# Altium PCB GripperBottomBoard.PcbDoc (part 2 of 4)
Units mm, origin at the board's own origin, x right, y up, seen from the top; angles counter-clockwise.
Board outline 79.5 x 85 mm, 6 copper layers (Top Layer, GND 01, SIG 01, PWR, GND 02, Bottom Layer), stack 1.705 mm thick; 155 components, 93 nets, 613 pads, 240 vias.
Unrouted connection lines stored in the file: 155.
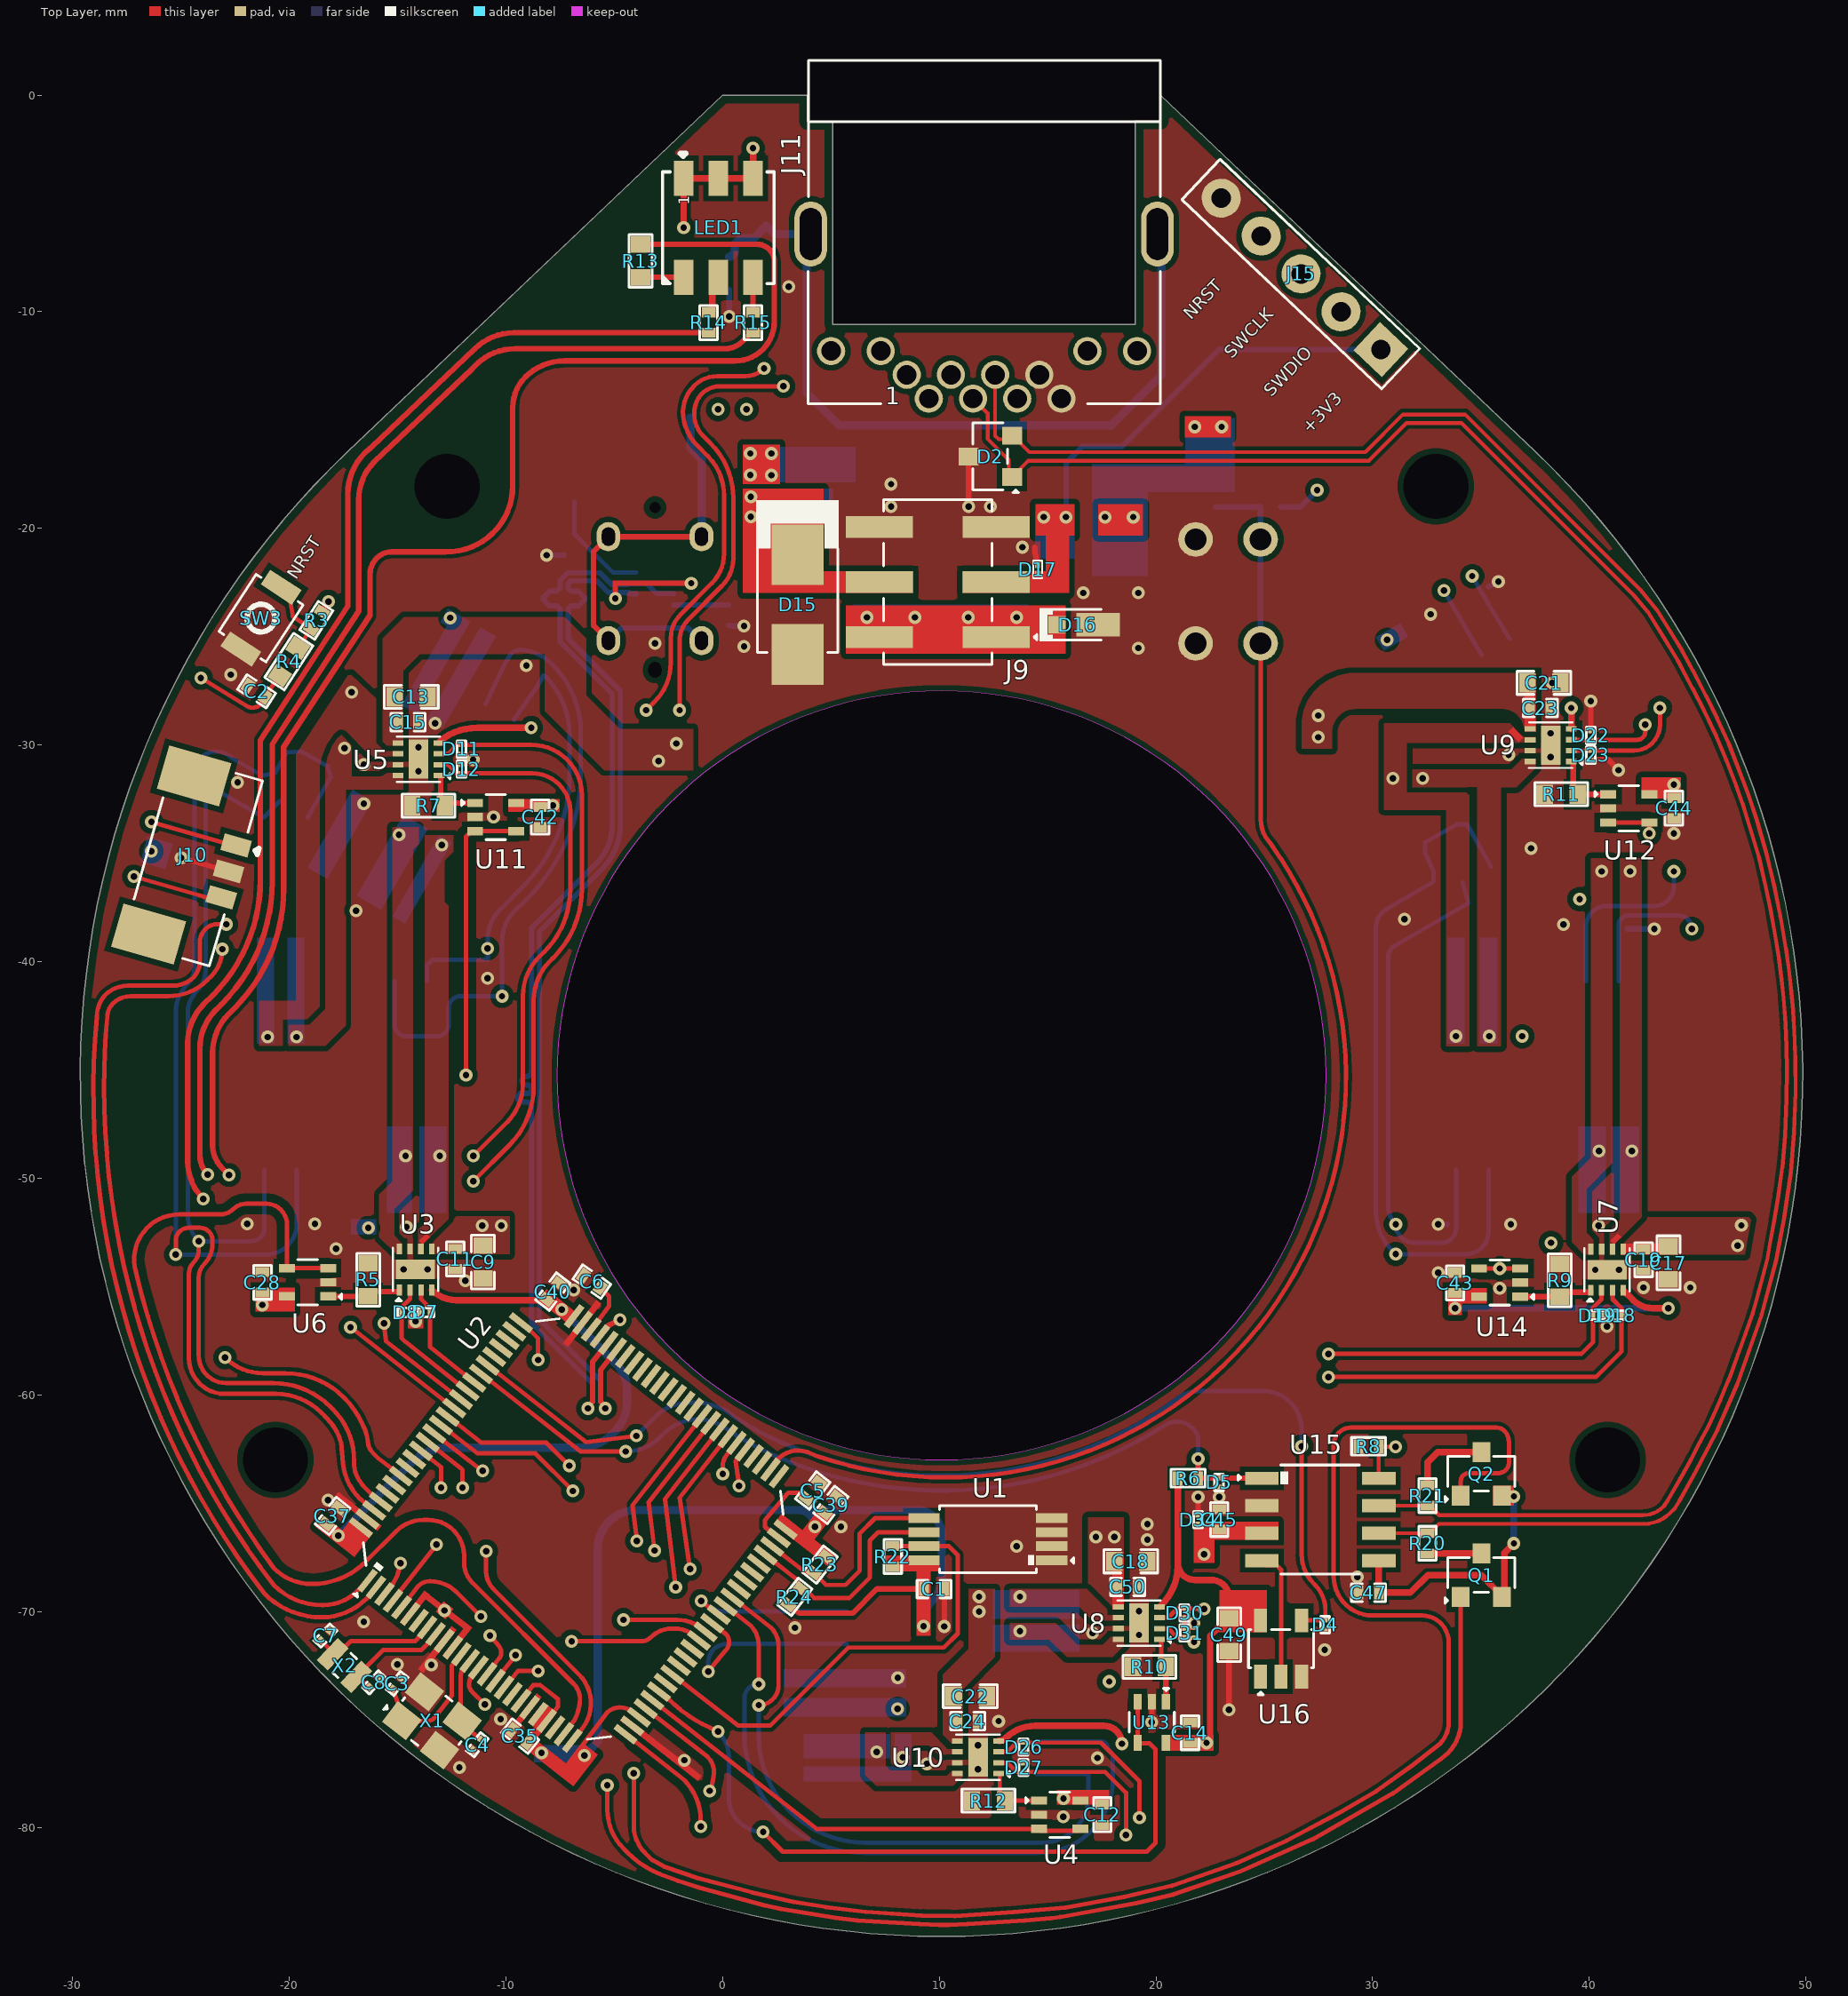
[diagram p0: Top Layer view]

## Part data (continued)
R6: library part RC0402FR-071KL, "RES 1K OHM 1% 1/16W 0402", Case Code (Imperial)=0402, Case Code (Metric)=1005, LCSC Part Number=C106235, Manufacturer=Yageo, Max Operating Temperature=155°C, Max Power Dissipation=63mW, Min Operating Temperature=-55°C, Power Rating=62.5mW, Resistance=1kR, Resistance Tolerance=1%, Resistor Type="Thick Film", Temperature Coefficient=100ppm/°C, Voltage Rating=50V, Case/Package=0402, Category="Chip SMD Resistors", ComponentLink1Description=https://datasheet.ciiva.com/11819/0900766b80c66297-11819477.pdf?src-supplier=RSComponents, ComponentLink1URL=https://datasheet.ciiva.com/11819/0900766b80c66297-11819477.pdf?src-supplier=RSComponents, ComponentLink2Description=https://datasheet.ciiva.com/7983/1018594-7983502.pdf?src-supplier=Element14, ComponentLink2URL=https://datasheet.ciiva.com/7983/1018594-7983502.pdf?src-supplier=Element14, ComponentLink3Description=https://datasheet.ciiva.com/22747/1018594-22747513.pdf?src-supplier=Element14, ComponentLink3URL=https://datasheet.ciiva.com/22747/1018594-22747513.pdf?src-supplier=Element14, ComponentLink4Description=https://datasheet.ciiva.com/12666/pyu-rc0402-51-rohs-l-6-r-12666741.pdf?src-supplier=Mouser, ComponentLink4URL=https://datasheet.ciiva.com/12666/pyu-rc0402-51-rohs-l-6-r-12666741.pdf?src-supplier=Mouser, ComponentLink5Description=https://datasheet.ciiva.com/7849/1018594-7849869.pdf?src-supplier=Element14, ComponentLink5URL=https://datasheet.ciiva.com/7849/1018594-7849869.pdf?src-supplier=Element14, ComponentLink6Description=https://datasheet.ciiva.com/7849/1018594-7849871.pdf?src-supplier=Element14, ComponentLink6URL=https://datasheet.ciiva.com/7849/1018594-7849871.pdf?src-supplier=Element14, ComponentLink7Description=https://datasheet.ciiva.com/17063/pyu-rc0402-51-rohs-l-6-r-17063193.pdf?src-supplier=Future+Electronics, ComponentLink7URL=https://datasheet.ciiva.com/17063/pyu-rc0402-51-rohs-l-6-r-17063193.pdf?src-supplier=Future+Electronics, Construction=Rectangular, Depth=0.5mm, Features="Moisture Resistant", Height=0.32mm, Item Type=Resistor, Lead Free="Lead Free", Length=1mm, Manufacturer Part Number=RC0402FR-071KL, Military Standard=Not, Number of Pins=2, Number of Terminations=2, Packaging="Tape and Reel", Pricing 1="10000=0.00085, 20000=0.00087, 40000=0.00084, 60000=0.00083, 80000=0.00079, 100000=0.00078, 1000000=0.00076 (USD)", Reach SVHC Compliant=Yes, RoHS=Yes, RoHS Compliant=Yes, Series=RC, Size Code=0402, Stock 1=13030000, Supplier 1=Avnet, Supplier Part Number 1=RC0402FR-071KL, Technology="THICK FILM", Termination=SMD/SMT, Tolerance=1%, Voltage Rating (DC)=50V, Width=0.5mm
R8: library part CRCW04021K00FKEDHP, "RES SMD 1K OHM 1% 1/5W 0402", Case Code (Imperial)=0402, Case Code (Metric)=1005, LCSC Part Number=C313354, Manufacturer="Vishay Dale", Max Operating Temperature=155°C, Max Power Dissipation=125mW, Min Operating Temperature=-55°C, Package Quantity=10, Resistance=1kR, Resistance Tolerance=1%, Resistor Type="Thick Film", Supplier Part Number 1=541-1.00KYCT-ND, Temperature Coefficient=100ppm/°C, Voltage Rating=50V, Case/Package=0402, ComponentLink1Description=http://www.farnell.com/datasheets/2339608.pdf?src-supplier=Element14, ComponentLink1URL=http://www.farnell.com/datasheets/2339608.pdf?src-supplier=Element14, ComponentLink2Description=http://www.vishay.com/docs/20043/crcwhpe3.pdf?src-supplier=Digi-Key, ComponentLink2URL=http://www.vishay.com/docs/20043/crcwhpe3.pdf?src-supplier=Digi-Key, ComponentLink3Description=http://www.mouser.com/ds/2/427/crcwhpe3-46056.pdf?src-supplier=Mouser, ComponentLink3URL=http://www.mouser.com/ds/2/427/crcwhpe3-46056.pdf?src-supplier=Mouser, ComponentLink4Description=http://www.vishay.com/docs/20043/crcwhpe3.pdf?src-supplier=Avnet, ComponentLink4URL=http://www.vishay.com/docs/20043/crcwhpe3.pdf?src-supplier=Avnet, ComponentLink5Description=http://www.vishay.com/docs/20043/crcwhpe3.pdf?src-supplier=Future+Electronics, ComponentLink5URL=http://www.vishay.com/docs/20043/crcwhpe3.pdf?src-supplier=Future+Electronics, Construction=Rectangular, Contact Plating=Tin, Depth=0.5mm, Features="Automotive AEC-Q200", Height=0.3mm, Lead Free="Lead Free", Length=1mm, Manufacturer Part Number=CRCW04021K00FKEDHP, Military Standard=Not, Mount="Surface Mount", Number of Pins=2, Number of Terminations=2, Packaging="Tape and Reel", Power Rating=125mW, Pricing 1="1=0.15, 10=0.132, 100=0.0506, 1000=0.02226, 2500=0.01923, 5000=0.0172 (USD)", Radiation Hardening=No, REACH SVHC=Unknown, RoHS Compliant=Yes, Series=CRCW-HP, Size Code=0402, Stock 1=315989, Supplier 1=Digi-Key, Technology="THICK FILM", Termination=SMD/SMT, Tolerance=1%, Voltage Rating (DC)=50V, Weight=2.3E-05oz, Width=0.5mm
R13: library part RC0603FR-07150RL, "RES SMD 150OHM 1/10W 0603", Case Code (Imperial)=0603, Case Code (Metric)=1608, LCSC Part Number=C114608, Manufacturer=Yageo, Max Operating Temperature=155°C, Max Power Dissipation=100mW, Min Operating Temperature=-55°C, Package Quantity=5000, Resistance Tolerance=1%, Resistor Type="Thick Film", Supplier Part Number 1=311-150HRCT-ND, Temperature Coefficient=100ppm/°C, Voltage Rating=50V, Case/Package=0603, Category="Chip SMD Resistors", ComponentLink1Description=https://datasheet.ciiva.com/46412/443971-46412844.pdf?src-supplier=Element14, ComponentLink1URL=https://datasheet.ciiva.com/46412/443971-46412844.pdf?src-supplier=Element14, ComponentLink2Description=https://datasheet.ciiva.com/46440/1868787-46440893.pdf?src-supplier=Element14, ComponentLink2URL=https://datasheet.ciiva.com/46440/1868787-46440893.pdf?src-supplier=Element14, ComponentLink3Description=https://datasheet.ciiva.com/12555/rc0603-272842-12555301.pdf?src-supplier=Mouser, ComponentLink3URL=https://datasheet.ciiva.com/12555/rc0603-272842-12555301.pdf?src-supplier=Mouser, Construction=Rectangular, Depth=0.8mm, Features="Moisture Resistant", Height=0.45mm, Lead Free="Lead Free", Length=1.6mm, Manufacturer Part Number=RC0603FR-07150RL, Military Standard=Not, Number of Pins=2, Number of Terminations=2, Packaging="Tape and Reel", Power Rating=100mW, Pricing 1="1=0.10000, 10=0.02400, 100=0.00970, 1000=0.00436, 2500=0.00378 (USD)", REACH SVHC="No SVHC", Resistance=150R, RoHS=Yes, RoHS Compliant=Yes, Series=RC, Size Code=0603, Stock 1=263721, Supplier 1=Digi-Key, Termination=SMD/SMT, Tolerance=1%, Voltage Rating (DC)=50V, Width=0.8mm
R14 R15: library part RC0402FR-0747RL, "RES 47 OHM 1% 1/16W 0402", Case Code (Imperial)=0402, Case Code (Metric)=1005, LCSC Part Number=C137973, Manufacturer=Yageo, Max Operating Temperature=155°C, Max Power Dissipation=63mW, Min Operating Temperature=-55°C, Package Quantity=1, Resistance Tolerance=1%, Resistor Type="Thick Film", Temperature Coefficient=100ppm/°C, Voltage Rating=50V, Case/Package=0402, Category="Chip SMD Resistors", ComponentLink1Description=LCSC, ComponentLink1URL=https://www.lcsc.com/product-detail/Chip-span-style-background-color-ff0-Resistor-span-Surface-Mount_YAGEO-RC0402FR-0747RL_C137973.html, Construction=Rectangular, Depth=0.5mm, Features="Moisture Resistant", Height=0.016inch, Item Type=Resistor, Lead Free="Lead Free", Length=1mm, Manufacturer Part Number=RC0402FR-0747RL, Military Standard=Not, Number of Terminations=2, Packaging="Tape and Reel", Power Rating=63mW, Pricing 1="10000=0.00085 (USD)", Resistance=47R, RoHS=Yes, RoHS Compliant=Yes, Series=RC, Size Code=0402, Stock 1=390000, Supplier 1=Avnet, Supplier Part Number 1=RC0402FR-0747RL, Technology="THICK FILM", Termination=SMD/SMT, Tolerance=1%, Weight=2.3E-05oz, Width=0.02inch
R17 R18: library part RC0402FR-075K1L, "RES 5.1K OHM 1% 1/16W 0402", Case Code (Imperial)=0402, Case Code (Metric)=1005, LCSC Part Number=C105872, Manufacturer=Yageo, Max Operating Temperature=155°C, Max Power Dissipation=63mW, Min Operating Temperature=-55°C, Package Quantity=1, Resistance=5.1kR, Resistance Tolerance=1%, Resistor Type="Thick Film", Temperature Coefficient=100ppm/°C, Voltage Rating=50V, Case/Package=0402, Category="Chip SMD Resistors", ComponentLink1Description=https://datasheet.ciiva.com/7983/1018594-7983519.pdf?src-supplier=Element14, ComponentLink1URL=https://datasheet.ciiva.com/7983/1018594-7983519.pdf?src-supplier=Element14, ComponentLink2Description=https://datasheet.ciiva.com/46394/1018594-46394936.pdf?src-supplier=Element14, ComponentLink2URL=https://datasheet.ciiva.com/46394/1018594-46394936.pdf?src-supplier=Element14, ComponentLink3Description=https://datasheet.ciiva.com/2453/pyu-r-int-thick-7-2453401.pdf?src-supplier=Digi-Key, ComponentLink3URL=https://datasheet.ciiva.com/2453/pyu-r-int-thick-7-2453401.pdf?src-supplier=Digi-Key, ComponentLink4Description=https://datasheet.ciiva.com/2453/pyu-r-int-thick-7-2453402.pdf?src-supplier=Digi-Key, ComponentLink4URL=https://datasheet.ciiva.com/2453/pyu-r-int-thick-7-2453402.pdf?src-supplier=Digi-Key, ComponentLink5Description=https://datasheet.ciiva.com/2453/pyu-r-int-thick-7-2453400.pdf?src-supplier=Digi-Key, ComponentLink5URL=https://datasheet.ciiva.com/2453/pyu-r-int-thick-7-2453400.pdf?src-supplier=Digi-Key, ComponentLink6Description=https://datasheet.ciiva.com/12558/pyu-rc0402-51-rohs-l-6-r-8721-12558460.pdf?src-supplier=Mouser, ComponentLink6URL=https://datasheet.ciiva.com/12558/pyu-rc0402-51-rohs-l-6-r-8721-12558460.pdf?src-supplier=Mouser, ComponentLink7Description=https://datasheet.ciiva.com/16744/pyu-rc0402-51-rohs-l-6-r-16744283.pdf?src-supplier=Future+Electronics, ComponentLink7URL=https://datasheet.ciiva.com/16744/pyu-rc0402-51-rohs-l-6-r-16744283.pdf?src-supplier=Future+Electronics, ComponentLink8Description=https://datasheet.ciiva.com/15189/getdatasheetpartid-323636-15189493.pdf?src-supplier=Verical, ComponentLink8URL=https://datasheet.ciiva.com/15189/getdatasheetpartid-323636-15189493.pdf?src-supplier=Verical, Construction=Rectangular, Depth=0.5mm, Features="Moisture Resistant", Height=0.016inch, Item Type=Resistor, Lead Free="Lead Free", Length=1mm, Manufacturer Part Number=RC0402FR-075K1L, Military Standard=Not, Number of Terminations=2, Packaging="Tape and Reel", Power Rating=63mW, Pricing 1="10000=0.00085 (USD)", RoHS=Yes, RoHS Compliant=Yes, Series=RC, Stock 1=65000, Supplier 1=Avnet, Supplier Part Number 1=RC0402FR-075K1L, Technology="THICK FILM", Termination=SMD/SMT, Tolerance=1%, Voltage Rating (DC)=50V, Width=0.02inch, Working Voltage=50V
R19 R25: library part RC0603FR-071ML, "RES SMD 1M OHM 1% 1/10W 0603", Case Code (Imperial)=0603, Case Code (Metric)=1608, LCSC Part Number=C105578, Manufacturer=Yageo, Max Operating Temperature=155°C, Min Operating Temperature=-55°C, Package Quantity=5000, Power Rating=100mW, Resistance=1MR, Supplier Part Number 1=311-1.00MHRDKR-ND, Temperature Coefficient=100ppm/°C, Tolerance=1%, Voltage Rating=50V, Case/Package=0603, ComponentLink1Description=http://www.farnell.com/datasheets/2167052.pdf?src-supplier=Mouser, ComponentLink1URL=http://www.farnell.com/datasheets/2167052.pdf?src-supplier=Mouser, ComponentLink2Description=http://www.farnell.com/datasheets/2167052.pdf?src-supplier=Element14, ComponentLink2URL=http://www.farnell.com/datasheets/2167052.pdf?src-supplier=Element14, ComponentLink3Description=http://documents.rs-components.com/techlib://itc_doclist_GB.htm?stockno=5048956&src-supplier=RSComponents, ComponentLink3URL=http://documents.rs-components.com/techlib://itc_doclist_GB.htm?stockno=5048956&src-supplier=RSComponents, Composition="Thick Film", Depth=0.8mm, Height=0.45mm, Item Type=Resistor, Lead Free="Lead Free", Length=1.6mm, Manufacturer Part Number=RC0603FR-071ML, Military Standard=Not, Number of Pins=2, Packaging="Tape and Reel", Pricing 1="1=0.1, 10=0.023, 100=0.0094, 1000=0.00421, 2500=0.00366 (USD)", REACH SVHC="No SVHC", Stock 1=3824601, Supplier 1=Digi-Key, Termination=SMD/SMT, Voltage Rating (DC)=50V, Width=0.8mm
R20 R21: library part ERJ-2RKF57R6X, "RES SMD 57.6 OHM 1% 1/10W 0402", LCSC Part Number=C3025671, Manufacturer=Panasonic, Supplier Part Number=667-ERJ-2RKF57R6X, ComponentLink1Description=https://datasheet.ciiva.com/9188/aoa0000ce2-9188571.pdf?src-supplier=Avnet, ComponentLink1URL=https://datasheet.ciiva.com/9188/aoa0000ce2-9188571.pdf?src-supplier=Avnet, ComponentLink2Description=https://datasheet.ciiva.com/9188/aoa0000ce2-9188574.pdf?src-supplier=Avnet, ComponentLink2URL=https://datasheet.ciiva.com/9188/aoa0000ce2-9188574.pdf?src-supplier=Avnet, ComponentLink3Description=https://datasheet.ciiva.com/24026/aoa0000ce2-24026248.pdf?src-supplier=Mouser, ComponentLink3URL=https://datasheet.ciiva.com/24026/aoa0000ce2-24026248.pdf?src-supplier=Mouser, ComponentLink4Description=https://datasheet.ciiva.com/43467/1678782-43467198.pdf?src-supplier=Farnell, ComponentLink4URL=https://datasheet.ciiva.com/43467/1678782-43467198.pdf?src-supplier=Farnell, ComponentLink5Description=https://datasheet.ciiva.com/46372/1678782-46372935.pdf?src-supplier=Element14, ComponentLink5URL=https://datasheet.ciiva.com/46372/1678782-46372935.pdf?src-supplier=Element14, ComponentLink6Description=https://datasheet.ciiva.com/46372/1678782-46372936.pdf?src-supplier=Element14, ComponentLink6URL=https://datasheet.ciiva.com/46372/1678782-46372936.pdf?src-supplier=Element14, ComponentLink7Description=https://datasheet.ciiva.com/22668/1678782-22668391.pdf?src-supplier=Element14, ComponentLink7URL=https://datasheet.ciiva.com/22668/1678782-22668391.pdf?src-supplier=Element14, ComponentLink8Description=https://datasheet.ciiva.com/22743/1678782-22743894.pdf?src-supplier=Element14, ComponentLink8URL=https://datasheet.ciiva.com/22743/1678782-22743894.pdf?src-supplier=Element14, ComponentLink9Description=https://datasheet.ciiva.com/30107/aoa0000ce2-30107676.pdf?src-supplier=Onlinecomponents.com, ComponentLink9URL=https://datasheet.ciiva.com/30107/aoa0000ce2-30107676.pdf?src-supplier=Onlinecomponents.com, Item Type=Resistors, Manufacturer Part Number=ERJ-2RKF57R6X, Pricing="1=0.1, 10=0.015, 50=0.015, 100=0.009, 1000=0.006, 10000=0.003 (USD)", RoHS=Yes, Stock=32931, Supplier=Mouser
R23 R24: library part RC0402FR-074K7L, "RES 4.7K OHM 1% 1/16W 0402", Case Code (Imperial)=0402, Case Code (Metric)=1005, LCSC Part Number=C105871, Manufacturer=Yageo, Max Operating Temperature=155°C, Max Power Dissipation=63mW, Min Operating Temperature=-55°C, Power Rating=62.5mW, Resistance=4.7kR, Resistance Tolerance=1%, Resistor Type="Thick Film", Temperature Coefficient=100ppm/°C, Voltage Rating=50V, Case/Package=0402, Category="Chip SMD Resistors", ComponentLink1Description=https://datasheet.ciiva.com/22661/1686128-22661342.pdf?src-supplier=Element14, ComponentLink1URL=https://datasheet.ciiva.com/22661/1686128-22661342.pdf?src-supplier=Element14, ComponentLink2Description=https://datasheet.ciiva.com/7850/1018594-7850022.pdf?src-supplier=Element14, ComponentLink2URL=https://datasheet.ciiva.com/7850/1018594-7850022.pdf?src-supplier=Element14, ComponentLink3Description=https://datasheet.ciiva.com/7850/1018594-7850023.pdf?src-supplier=Element14, ComponentLink3URL=https://datasheet.ciiva.com/7850/1018594-7850023.pdf?src-supplier=Element14, ComponentLink4Description=https://datasheet.ciiva.com/15215/getdatasheetpartid-328119-15215035.pdf?src-supplier=Verical, ComponentLink4URL=https://datasheet.ciiva.com/15215/getdatasheetpartid-328119-15215035.pdf?src-supplier=Verical, Construction=Rectangular, Depth=0.5mm, Features="Moisture Resistant", Height=0.32mm, Height - Seated (Max)=0.016inch, Item Type=Resistor, Lead Free="Lead Free", Length=1mm, Manufacturer Part Number=RC0402FR-074K7L, Military Standard=Not, Number of Pins=2, Number of Terminations=2, Packaging="Tape and Reel", Pricing 1="10000=0.00085 (USD)", Reach SVHC Compliant=Yes, RoHS=Yes, RoHS Compliant=Yes, Series=RC, Size Code=0402, Stock 1=2420000, Supplier 1=Avnet, Supplier Part Number 1=RC0402FR-074K7L, Termination=SMD/SMT, Tolerance=1%, Voltage Rating (DC)=50V, Width=0.5mm
SW1: "4.5mm 7mm 50mA Round Button Straight 4.5mm 180gf 12V Plugin Tactile Switches ROHS", LCSC Part Number=C2888497, Manufacturer=BZCN, Package=Plugin, Item Type=Connector, Manufacturer Part Number=TSC016A07018A
SW3: "SWITCH TACTILE SPST-NO 0.05A 12V", Contact Current Rating=50mA, Contact Resistance=100mR, Insulation Resistance=100MR, LCSC Part Number=C231329, Manufacturer=Omron, Max Operating Temperature=70°C, Max Voltage Rating (DC)=12V, Min Operating Temperature=-25°C, Operating Force=1.5N, Package Quantity=1, Ratings="Dust Proof,IP40", Supplier Part Number 1=SW1020DKR-ND, Actuator Length=0.4mm, Actuator Type=Standard, ComponentLink1Description=http://www.farnell.com/datasheets/60838.pdf?src-supplier=Farnell, ComponentLink1URL=http://www.farnell.com/datasheets/60838.pdf?src-supplier=Farnell, ComponentLink2Description=http://www.farnell.com/datasheets/60838.pdf?src-supplier=Element14, ComponentLink2URL=http://www.farnell.com/datasheets/60838.pdf?src-supplier=Element14, ComponentLink3Description=https://omronfs.omron.com/en_US/ecb/products/pdf/en-b3u.pdf?src-supplier=Digi-Key, ComponentLink3URL=https://omronfs.omron.com/en_US/ecb/products/pdf/en-b3u.pdf?src-supplier=Digi-Key, ComponentLink4Description=http://www.omron.com/ecb/products/pdf/en-b3u.pdf?src-supplier=Digi-Key, ComponentLink4URL=http://www.omron.com/ecb/products/pdf/en-b3u.pdf?src-supplier=Digi-Key, ComponentLink5Description=https://www.distrelec.biz/Web/Downloads/he/et/B3U_eng_datasheet.pdf?mime=application%2Fpdf&src-supplier=Distrelec, ComponentLink5URL=https://www.distrelec.biz/Web/Downloads/he/et/B3U_eng_datasheet.pdf?mime=application%2Fpdf&src-supplier=Distrelec, ComponentLink6Description=http://www.onlinecomponents.com/productFiles/mf-OM/en-b3u.pdf?src-supplier=Onlinecomponents.com, ComponentLink6URL=http://www.onlinecomponents.com/productFiles/mf-OM/en-b3u.pdf?src-supplier=Onlinecomponents.com, ComponentLink7Description=https://www.verical.com/server-webapp/html/getDatasheet?partID=552554&src-supplier=Verical, ComponentLink7URL=https://www.verical.com/server-webapp/html/getDatasheet?partID=552554&src-supplier=Verical, ComponentLink8Description=http://www.farnell.com/datasheets/1685550.pdf?src-supplier=Element14, ComponentLink8URL=http://www.farnell.com/datasheets/1685550.pdf?src-supplier=Element14, ComponentLink9Description=http://www.farnell.com/datasheets/2610940.pdf?src-supplier=Farnell, ComponentLink9URL=http://www.farnell.com/datasheets/2610940.pdf?src-supplier=Farnell, ComponentLink10Description=https://www.alliedelec.com/m/d/4c8a9ef82804fc3c241a13c1e298fd73.pdf?src-supplier=Allied+Electronics, ComponentLink10URL=https://www.alliedelec.com/m/d/4c8a9ef82804fc3c241a13c1e298fd73.pdf?src-supplier=Allied+Electronics, Contact Material=Silver, Current Rating=50mA, Depth=2.5mm, Electrical Life=200000Cycles, Height=1.2mm, Illumination Type=Non-Illuminated,Illuminated, Item Type=Switch, Lead Free="Lead Free", Length=4mm, Manufacturer Part Number=B3U-1000P, Max Current Rating=50mA, Mechanical Life=200000Cycles, Mount="Surface Mount", Orientation=Straight, Packaging="Tape and Reel", Pricing 1="1=1, 10=0.961, 25=0.9064, 50=0.7976, 100=0.7251, 250=0.68888, 500=0.67074, 1000=0.52571 (USD)", REACH SVHC=Unknown, Stock 1=116454, Supplier 1=Digi-Key, Switch Function=Off-Mom, Switch Travel=0.15mm, Termination=SMD/SMT, Throw Configuration=SPST, Voltage Rating (DC)=12V, Weight=0.000776oz, Width=3mm
U1: "IC SENSOR THERMAL 3.0V 8TSSOP", Case/Package=TSSOP, LCSC Part Number=C636441, Manufacturer=Microchip, Max Operating Temperature=125°C, Max Supply Voltage=3.6V, Min Operating Temperature=-40°C, Min Supply Voltage=3V, Operating Supply Current=200uA, Output Current=1uA, Package Quantity=100, Supplier Part Number 1=MCP9805-BE/ST-ND, Accuracy=2%, Category="Power Management ICs", ComponentLink1Description=https://datasheet.ciiva.com/22737/1678782-22737270.pdf?src-supplier=Element14, ComponentLink1URL=https://datasheet.ciiva.com/22737/1678782-22737270.pdf?src-supplier=Element14, ComponentLink2Description=https://datasheet.ciiva.com/43467/1678782-43467032.pdf?src-supplier=Farnell, ComponentLink2URL=https://datasheet.ciiva.com/43467/1678782-43467032.pdf?src-supplier=Farnell, ComponentLink3Description=https://datasheet.ciiva.com/22673/1678782-22673662.pdf?src-supplier=Element14, ComponentLink3URL=https://datasheet.ciiva.com/22673/1678782-22673662.pdf?src-supplier=Element14, ComponentLink4Description=https://datasheet.ciiva.com/1514/1791047-1514016.pdf?src-supplier=Element14, ComponentLink4URL=https://datasheet.ciiva.com/1514/1791047-1514016.pdf?src-supplier=Element14, ComponentLink5Description=https://datasheet.ciiva.com/2003/21977b-2003478.pdf?src-supplier=Digi-Key, ComponentLink5URL=https://datasheet.ciiva.com/2003/21977b-2003478.pdf?src-supplier=Digi-Key, ComponentLink6Description=https://datasheet.ciiva.com/5299/21977b-77986-5299688.pdf?src-supplier=Mouser, ComponentLink6URL=https://datasheet.ciiva.com/5299/21977b-77986-5299688.pdf?src-supplier=Mouser, ComponentLink7Description=https://datasheet.ciiva.com/3279/21977b-3279902.pdf?src-supplier=Avnet, ComponentLink7URL=https://datasheet.ciiva.com/3279/21977b-3279902.pdf?src-supplier=Avnet, Height=1mm, Interface=I2C,SMBus,2-Wire,Serial, Item Type=IC, Lead Free="Lead Free", Length=3mm, Manufacturer Part Number=MCP9805-BE/ST, Max Supply Voltage (DC)=3.6V, Min Supply Voltage (DC)=3V, Mount="Surface Mount", Number of Bits=10, Number of Pins=8, Output Type=I2C,Digital, Packaging=Rail/Tube, Pricing 1="1=0.85000, 25=0.71000, 100=0.65000 (USD)", Radiation Hardening=No, REACH SVHC="No SVHC", Resolution=10b, RoHS=Yes, RoHS Compliant=Yes, Sensing Method=Resistive, Sensor Type=Temperature, Stock 1=667, Supplier 1=Digi-Key, Termination=SMD/SMT, Width=4.4mm
U2: "IC MCU 32BIT 512KB FLASH 100LQFP", Case/Package=LQFP, Frequency=168MHz, LCSC Part Number=C28730, Manufacturer=STMicroelectronics, Max Operating Temperature=85°C, Max Supply Voltage=3.6V, Min Operating Temperature=-40°C, Min Supply Voltage=1.8V, Package Quantity=90, Supplier Part Number 1=73T7121, Category=Microcontrollers, ComponentLink1Description=https://datasheet.ciiva.com/16330/dm00037051-16330920.pdf?src-supplier=Future+Electronics, ComponentLink1URL=https://datasheet.ciiva.com/16330/dm00037051-16330920.pdf?src-supplier=Future+Electronics, ComponentLink2Description=https://datasheet.ciiva.com/8055/1717982-8055038.pdf?src-supplier=Element14, ComponentLink2URL=https://datasheet.ciiva.com/8055/1717982-8055038.pdf?src-supplier=Element14, ComponentLink3Description=https://datasheet.ciiva.com/4837/dm00037051-492832-4837637.pdf?src-supplier=Mouser, ComponentLink3URL=https://datasheet.ciiva.com/4837/dm00037051-492832-4837637.pdf?src-supplier=Mouser, Core Architecture=ARM, Data Bus Width=32b, Height=1.45mm, Interface=I2C,SPI,CAN,I2S,UART,USB,Ethernet,IrDA,USART,LIN,EBI/EMI, Item Type=IC, Lead Free="Lead Free", Length=14.2mm, Manufacturer Part Number=STM32F407VET6, Max Frequency=168MHz, Memory Size=512KB, Memory Type=FLASH, Number of ADC Channels=16, Number of Ethernet Channels=1, Number of I2C Channels=3, Number of I/Os=82, Number of Pins=100, Number of Programmable I/O=82, Number of PWM Channels=2, Number of SPI Channels=3, Number of Timers/Counters=14, Number of UART Channels=2, Oscillator Type=Internal, Packaging=Tray, Peripherals="Brown-out Detect/Reset,POR,PWM,WDT,DMA,LCD,I2C", Pricing 1="1=16.05000, 10=14.76000, 25=14.15000, 50=13.31000, 100=12.47000 (USD)", Radiation Hardening=No, RAM Size=196KB, REACH SVHC="No SVHC", RoHS=Yes, RoHS Compliant=Yes, Series="STM32 F4", Supplier 1=Newark, Watchdog Timer=Yes, Width=14.2mm
U3 U5 U7 U8 U9 U10: "33V H BRIDGE MOTOR DRIVER WITH C", LCSC Part Number=C5139865, Manufacturer="Texas Instruments", Supplier Part Number=595-DRV8231ADSGR, Height=800um, Item Type=IC, Length=2mm, Manufacturer Part Number=DRV8231ADSGR, Number of Channels=1NUMBER, Pins=8NUMBER, Pricing="1=1.52, 10=1.29, 50=1.29, 100=1.1, 1000=0.747, 10000=0.657 (USD)", RoHS=No, Stock=8609, Supplier=Mouser, Thickness=750um, Width=2mm
U4 U6 U11 U12 U13 U14: "IC CMOS 1 CIRCUIT SC70-5", Input Bias Current=5pA, Input Offset Voltage (Vos)=400uV, LCSC Part Number=C398362, Manufacturer="Texas Instruments", Max Operating Temperature=125°C, Min Operating Temperature=-40°C, Operating Supply Current=60uA, Output Current per Channel=40mA, Supplier Part Number=595-TLV9001IDCKR, ComponentLink1Description=http://www.ti.com/lit/ds/symlink/tlv9001.pdf?src-supplier=Digikey, ComponentLink1URL=http://www.ti.com/lit/ds/symlink/tlv9001.pdf?src-supplier=Digikey, Gain Bandwidth Product=1MHz, Item Type=IC, Manufacturer Part Number=TLV9001IDCKR, Mounting Technology="Surface Mount", Number of Channels=1, Number of Circuits=1, Packaging="Cut Tape", Pricing="1=0.47, 10=0.348, 50=0.348, 100=0.194, 1000=0.146, 10000=0.117 (USD)", RoHS=Yes, RoHS Compliant=Yes, Series=-, Slew Rate=2V/µs, Stock=13115, Supplier=Mouser
U15: "IC TRANSCEIVER HALF 1/1 8SOIC", LCSC Part Number=C188675, Manufacturer="Texas Instruments", ComponentLink1Description=https://datasheet.ciiva.com/28652/1787993-28652354.pdf?src-supplier=Element14, ComponentLink1URL=https://datasheet.ciiva.com/28652/1787993-28652354.pdf?src-supplier=Element14, ComponentLink2Description=https://datasheet.ciiva.com/41461/001187135-da-01-en-ic-transcv-sn65hvda1040aqdrq1-soic-8-tid-41461891.pdf?src-supplier=Conrad, ComponentLink2URL=https://datasheet.ciiva.com/41461/001187135-da-01-en-ic-transcv-sn65hvda1040aqdrq1-soic-8-tid-41461891.pdf?src-supplier=Conrad, ComponentLink3Description=https://datasheet.ciiva.com/15150/getdatasheetpartid-184324-15150727.pdf?src-supplier=Verical, ComponentLink3URL=https://datasheet.ciiva.com/15150/getdatasheetpartid-184324-15150727.pdf?src-supplier=Verical, ComponentLink4Description=https://datasheet.ciiva.com/1766/sn65hvda1040a-q1-1766438.pdf?src-supplier=Digikey, ComponentLink4URL=https://datasheet.ciiva.com/1766/sn65hvda1040a-q1-1766438.pdf?src-supplier=Digikey, ComponentLink5Description=https://datasheet.ciiva.com/1766/sn65hvda1040a-q1-1766439.pdf?src-supplier=Digikey, ComponentLink5URL=https://datasheet.ciiva.com/1766/sn65hvda1040a-q1-1766439.pdf?src-supplier=Digikey, ComponentLink6Description=https://datasheet.ciiva.com/1766/sn65hvda1040a-q1-1766440.pdf?src-supplier=Digikey, ComponentLink6URL=https://datasheet.ciiva.com/1766/sn65hvda1040a-q1-1766440.pdf?src-supplier=Digikey, Item Type=IC, Manufacturer Part Number=SN65HVDA1040AQDRQ1, Pricing="1=2.2, 10=1.87, 50=1.87, 100=1.59, 1000=1.08, 10000=0.971 (USD)", RoHS=Yes, Stock=5009, Supplier=Mouser
U16: "IC BUF NON-INVERT 5.5V SOT23-5", Case/Package=SOT-23-5, High Level Output Current=-8mA, LCSC Part Number=C100024, Low Level Output Current=8mA, Manufacturer="Texas Instruments", Max Operating Temperature=125°C, Max Supply Voltage=5.5V, Min Operating Temperature=-40°C, Min Supply Voltage=1.6V, Package Quantity=3000, Quiescent Current=1uA, Supplier Part Number 1=296-37176-6-ND, ComponentLink1Description=http://www.ti.com/lit/pdf/sdyu001?src-supplier=Digi-Key, ComponentLink1URL=http://www.ti.com/lit/pdf/sdyu001?src-supplier=Digi-Key, ComponentLink2Description=http://www.ti.com/lit/ds/symlink/sn74lv1t34.pdf?src-supplier=Avnet, ComponentLink2URL=http://www.ti.com/lit/ds/symlink/sn74lv1t34.pdf?src-supplier=Avnet, Item Type=IC, Lead Free="Lead Free", Logic Function=Buffer,Inverting, Manufacturer Part Number=SN74LV1T34DBVR, Mount="Surface Mount", Number of Bits=1, Number of Bits per Element=1, Number of Channels=1, Number of Elements=1, Number of Input Lines=1, Number of Inputs=1, Number of Output Lines=1, Number of Outputs=1, Number of Pins=5, Operating Supply Current=8mA, Packaging="Tape and Reel", Polarity=Non-Inverting, Pricing 1="1=0.43, 10=0.349, 25=0.3192, 100=0.2374, 250=0.2152, 500=0.17808, 1000=0.13356 (USD)", Propagation Delay=15.5ns, Radiation Hardening=No, REACH SVHC="No SVHC", RoHS Compliant=Yes, Stock 1=37360, Supplier 1=Digi-Key, Weight=0.000353oz
X1: library part X322520MSB4SI, "20MHz Surface Mount Crystal 20pF ±10ppm ±20ppm SMD3225-4P Crystals ROHS", LCSC Part Number=C9004, Manufacturer="YXC Crystal Oscillators", Package=SMD3225-4P, ComponentLink1Description=LCSC, ComponentLink1URL=https://www.lcsc.com/product-detail/Crystals_YXC-Crystal-Oscillators-X322520MSB4SI_C9004.html, Item Type=Crystals, Manufacturer Part Number=X322520MSB4SI
X2: library part FC-12M32.768KHZ7PF20PPM, "CRYSTAL 32.7680KHZ 9PF SMD", LCSC Part Number=C99009, Manufacturer="Seiko Epson", Package=SMD2012-2P, ComponentLink1Description=LCSC, ComponentLink1URL=https://www.lcsc.com/product-detail/Crystals_Seiko-Epson-FC-12M32-768KHZ7PF20PPM_C99009.html, Item Type=Crystal, Manufacturer Part Number=FC-12M32.768KHZ7PF20PPM

## Free pads (board coordinates)
  round 0 hole 3 unplated: MH1(-20.643,-63) MH1(-12.718,-18.055) MH1(32.92,-18.055) MH1(40.845,-63)

## Via types
v1: diameter 0.6, hole 0.3, Top Layer to Bottom Layer, tented both sides, 240 vias

## Nets (pads, with @x,y where several pads share a name; then routed paths per layer and width w, separated by ;. In a path a pad name is that pad's centre, name@x,y a point inside that pad or via, vN(x,y) a via of type N, cw(c..) or ccw(c..) an arc to the next point about the centre after c; other vN are vias at no path point)
+3V3: D17.2 FB1.1 J9.3 J15.1 | length 19.2
  Bottom Layer w0.254: v1(15.839,-19.479) 15.853,-19.465 15.853,-16.979 16.618,-16.214 18.442,-16.214 22.904,-11.752 J15.1@30.38,-11.752
  other v1: 14.82,-19.479
+3V3#: C1.2 C12.1 C14.1 C28.1 C34.2 C35.2 C37.2 C39.2 C40.2 C42.1 C43.1 C44.1 C49.2 D3.2 FB1.2 LED1.1 LED1.3 LED1.5 R1.2 R2.2 R3.1 R6.1 R16.1 R22.1 R23.1 R24.1 U1.8 U2.6 U2.11 U2.19 U2.21 U2.22 U2.28 U2.50 U2.75 U2.100 U3.4 U4.5 U5.4 U6.5 U7.4 U8.4 U9.4 U10.4 U11.5 U12.5 U13.5 U14.5 U16.5 | length 156.4
  Top Layer w0.203: U2.19@-9.303,-74.121 -8.994,-73.73 -8.742,-73.407 -8.422,-73.407 -7.61,-74.031 -7.61,-74.395 -7.812,-74.653 U2.22@-8.121,-75.045 ; C35.2@-9.125,-76.205 C35.2@-8.981,-76.044 ; -7.665,-77.181 cw(c-7.667,-76.677) -7.979,-77.074 -8.323,-76.805 v1(-8.358,-76.519) -7.718,-76.865 -7.264,-77.111 -7.179,-77.083 -7.11,-77.014 -5.321,-74.662 ; -5.32,-74.661 cw(c-5.159,-74.785) -5.294,-74.633 cw(c-4.757,-75.245) -4.756,-74.431 cw(c-4.757,-75.491) U2.28@-3.883,-74.89
  Top Layer w0.254: C35.2@-8.981,-76.044 -8.814,-75.932 -8.428,-75.437 U2.22@-8.121,-75.045 ; R24.1@3.037,-69.695 3.165,-69.8 3.526,-70.082 5.996,-70.082 7.115,-68.963 C1.2@9.291,-68.963
  Top Layer w0.305: R3.1@-18.494,-23.854 v1(-18.196,-23.386) ; U3.4@-13.424,-55.161 ccw(c-12.305,-54.042) -12.305,-55.624 C40.2@-7.74,-55.624 ; U5.4@-13.086,-29.906 cw(c-12.811,-30.038) -13.018,-29.814 cw(c-11.617,-31.336) -12.408,-29.424 cw(c-11.296,-32.11) -11.296,-29.203 v1(-8.834,-29.203) ; v1(-1.799,-6.122) LED1.1@-1.799,-3.834 LED1.3@-0.199,-3.834 LED1.5@1.401,-3.834 v1(1.401,-2.447) ; U10.4@12.738,-75.978 ccw(c12.738,-75.526) 13.058,-75.846 cw(c14.43,-77.218) 14.43,-75.278 17.592,-75.278 cw(c17.592,-76.104) 18.413,-76.01 v1(18.424,-76.104) v1@18.418,-76.104 ; U8.4@20.165,-69.784 20.262,-69.688 ccw(c18.466,-67.891) 21.006,-67.891 21.006,-67.762 ; R6.1@21.006,-63.846 21.006,-67.762 ; C14.1@21.566,-76.065 v1(22.33,-76.065) 22.498,-75.898 22.498,-71.122 22.81,-70.81 23.08,-70.81 23.319,-70.57 C49.2@23.319,-70.316 ; C49.2@23.319,-70.286 23.333,-70.273 C49.2@23.372,-70.312 ; 23.372,-69.38 ccw(c22.534,-69.38) 22.534,-68.542 21.786,-68.542 cw(c21.786,-67.762) 21.006,-67.762 ; v1(39.166,-28.292) 39.167,-28.293 U9.4@39.167,-29.259 ; U7.4@41.57,-55.176 42.014,-55.62 ccw(c42.933,-54.699) 42.933,-56 v1(43.648,-56)
  SIG 01 w0.305: v1(-8.834,-29.203) -7.715,-28.083 cw(c-5.919,-29.879) -5.919,-27.339 -5.5,-27.339 ; v1(-7.838,-32.79) -6.595,-32.79 ; -6.593,-32.79 ccw(c-6.593,-25.86) -1.693,-30.759 -1.3,-30.366 ccw(c-4.749,-26.914) 0.131,-26.914 0.131,-23.047 ; -5.499,-27.34 ccw(c-5.499,-25.837) -4.436,-26.899 ccw(c-5.467,-25.869) -4.009,-25.869 -4.009,-22.68 cw(c-3.1,-22.68) -3.1,-21.77 -1.815,-21.77
  Bottom Layer w0.254: R16.1@25.766,-19.014 26.659,-19.014 v1(27.439,-18.233)
  Bottom Layer w0.305: v1(33.806,-56) v1(43.648,-56)
  Bottom Layer w0.381: v1(-17.738,-66.5) -14.417,-63.179 cw(c-12.621,-64.975) -12.621,-62.435 -6.646,-62.435 ccw(c-6.644,-60.188) -5.061,-61.783 -5.036,-61.758 ccw(c-6.401,-60.308) -4.409,-60.308 -4.409,-59.777 ccw(c-6.077,-59.776) -4.899,-58.595 v1(-7.428,-56.066) ; v1(-6.388,-76.648) -5.766,-76.026 -5.766,-67.107 cw(c-3.975,-67.107) -3.975,-65.316 3.493,-65.316 ; v1(4.264,-66.087) ccw(c3.493,-66.087) 3.493,-65.316 ; v1(9.272,-70.684) 9.272,-70.482 cw(c10.707,-70.482) 9.692,-69.468 ; 9.693,-69.467 ccw(c8.678,-68.453) 10.113,-68.453 10.113,-66.472 ccw(c8.957,-66.472) 8.957,-65.316 3.493,-65.316
  other v1: 15.729,-78.632 -12.845,-69.954 -21.249,-55.848 -26.374,-34.906 43.903,-31.832 17.645,-19.479 18.948,-19.479 21.79,-15.314 23.028,-15.314 -0.214,-14.501 1.1,-14.501
+5V: D15.2 FB2.1 J9.4
  other v1: 1.3,-19.46 1.3,-18.536
+5V#: C10.2 C16.2 C25.2 C26.2 C27.2 C29.2 C30.2 C31.2 C32.2 C38.2 C41.2 C45.1 D34.2 D36.1 FB2.2 J1.3 J2.3 J3.3 J4.3 J5.3 J6.3 J7.3 J8.3 J12.3 J13.3 U15.3
  other v1: 8.079,-74.494 17.841,-73.234 22.225,-67.356 38.228,-52.98 -16.353,-52.295 36.902,-43.445 39.553,-37.112 30.667,-25.148 -12.575,-24.133 1.278,-17.542 2.249,-17.546 1.278,-16.545 2.249,-16.545
+12V: C9.2 C11.2 C13.2 C15.2 C17.2 C18.2 C19.2 C21.2 C22.2 C23.2 C24.2 C50.2 D16.2 J9.1 J9.2 U3.5 U5.5 U7.5 U8.5 U9.5 U10.5
  other v1: 11.835,-70 11.835,-69.321 17.228,-66.561 18.079,-66.561 46.841,-53.112 -11.098,-52.193 -10.209,-52.193 47.017,-52.175 -2.956,-30.746 -2.142,-29.931 27.487,-29.642 27.487,-28.639 6.661,-24.108 8.868,-24.108 11.334,-24.108 13.566,-24.108
ADC_1: U2.24 U6.3 U6.4 | length 50.1
  Top Layer w0.203: U6.3@-18.206,-54.152 U6.4@-20.106,-54.152 -20.106,-52.139 ccw(c-21.075,-52.139) -20.388,-51.455 ccw(c-21.058,-52.122) -21.057,-51.177 -21.059,-51.177 -22.001,-51.177 ccw(c-22.001,-51.989) -22.575,-51.415 cw(c-23.194,-50.796) -23.194,-51.671 -25.066,-51.671 ccw(c-25.083,-53.75) -27.084,-54.314 -27.057,-54.424 ccw(c9.493,-45.604) -20.698,-68.015 ccw(c-18.969,-66.286) -18.97,-68.731 ccw(c-18.969,-65.191) -16.465,-67.694 -15.074,-66.303 cw(c-13.788,-67.589) -13.788,-65.77 -13.591,-65.77 cw(c-13.591,-67.426) -11.934,-67.426 -11.934,-67.752 ccw(c-10.639,-67.752) -11.555,-68.668 ; -11.555,-68.668 -6.865,-73.358 cw(c-7.535,-74.029) -6.587,-74.029 cw(c-8.569,-74.029) -7.007,-75.249 -7.023,-75.27 U2.24@-7.333,-75.66
ADC_2: U2.25 U11.3 U11.4 | length 59.3
  Top Layer w0.203: v1(-11.846,-45.236) -11.846,-34.227 -11.598,-33.979 U11.3@-11.423,-33.979 U11.4@-9.523,-33.979 ; v1(-10.915,-67.215) -10.915,-68.149 ccw(c-9.765,-68.149) -10.579,-68.962 -6.63,-72.911 -6.629,-72.912 cw(c-7.959,-74.241) -6.452,-75.366 -6.625,-75.58 U2.25@-6.939,-75.968
  SIG 01 w0.203: v1(-11.846,-45.236) -17.323,-45.236 ccw(c-17.323,-47.723) -19.811,-47.723 -19.811,-55.65 ccw(c-16.433,-55.652) -18.821,-58.04 -15.638,-61.224 ccw(c-13.403,-58.991) -13.403,-62.15 -13.402,-62.15 -11.658,-62.15 cw(c-11.658,-63.777) -10.032,-63.777 -10.032,-65.296 cw(c-12.557,-65.296) v1(-10.915,-67.215)